# Altium PCB Baseboard-Development.PcbDoc (part 5 of 8)
Units mm, origin at the board's own origin, x right, y up, seen from the top; angles counter-clockwise.
Board outline 120 x 90 mm, 6 copper layers (Top Layer, SIGNAL-1, PWR, SIGNAL-2, GND-2, Bottom Layer), stack 1.705 mm thick; 417 components, 313 nets, 1500 pads, 606 vias.
Unrouted connection lines stored in the file: 357.
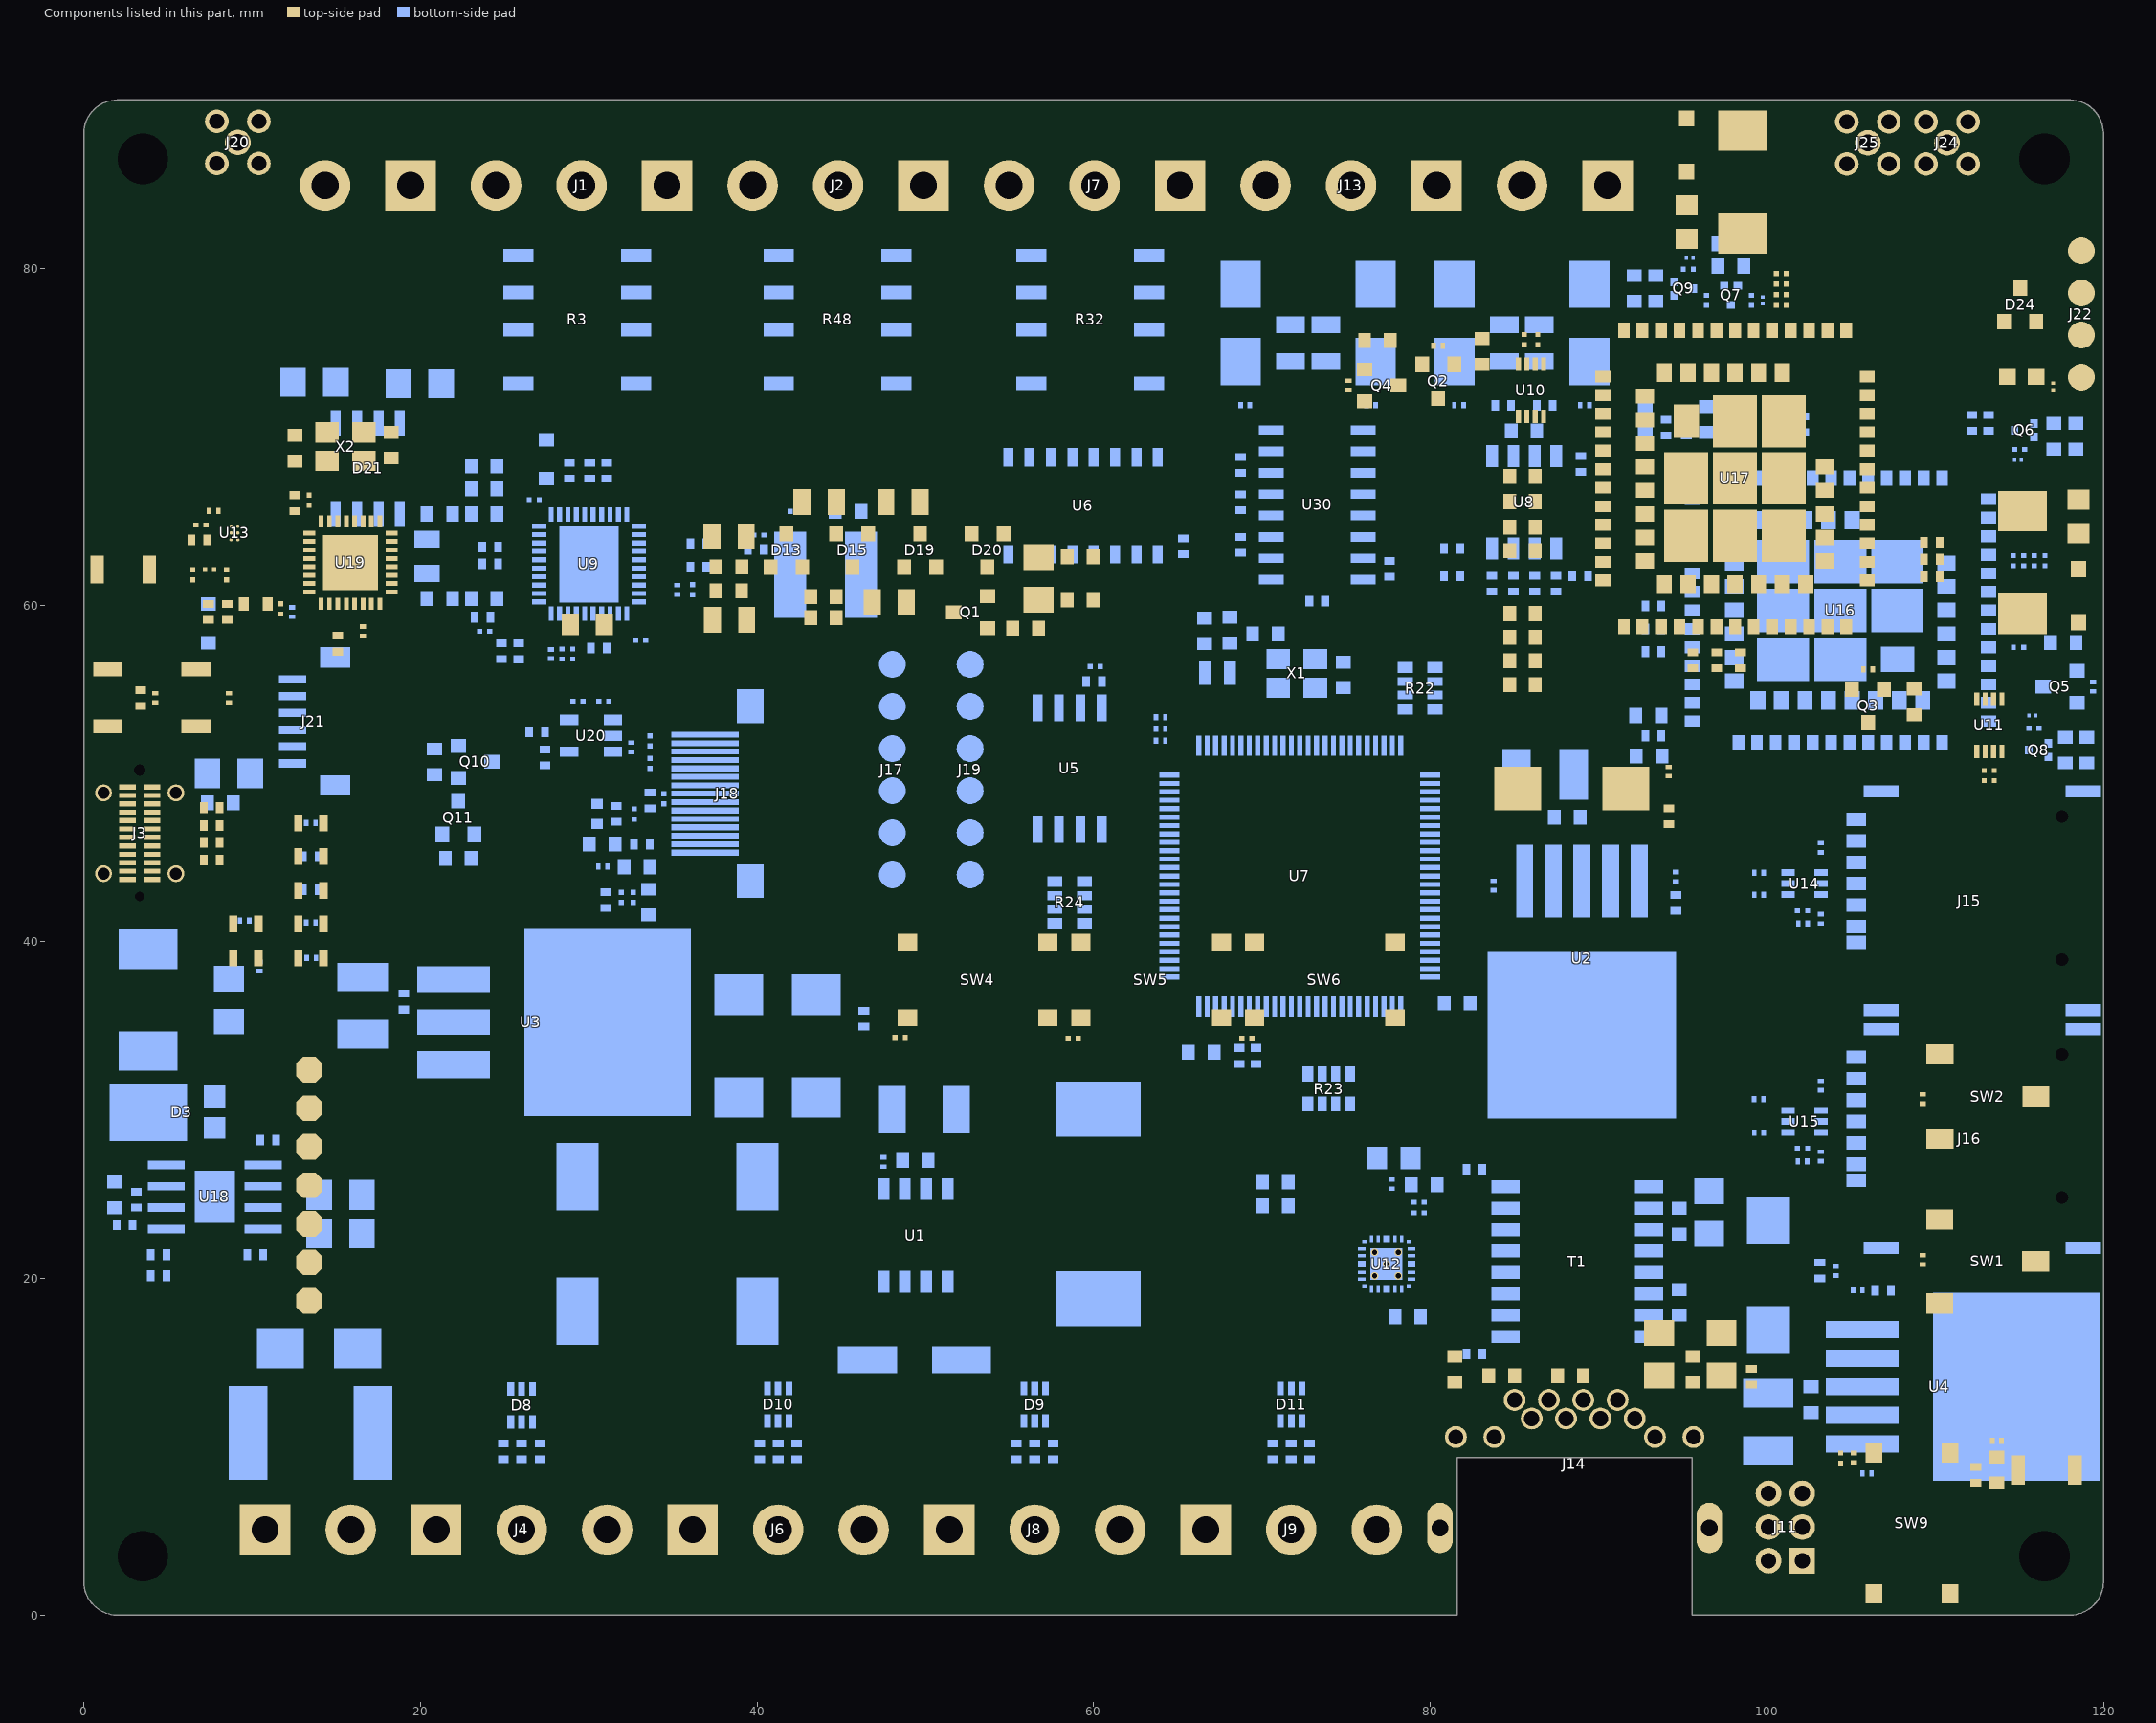
[diagram p6: the components of this part, seen from the top]

## Part data (continued)
SW3 SW7 SW8: "SWITCH TACTILE SPST-NO 0.05A 12V", Contact Current Rating=50mA, Contact Resistance=100mR, Insulation Resistance=100MR, LCSC Part Number=C231329, Manufacturer=Omron, Max Operating Temperature=70°C, Max Voltage Rating (DC)=12V, Min Operating Temperature=-25°C, Operating Force=1.5N, Package Quantity=1, Ratings="Dust Proof,IP40", Supplier Part Number 1=SW1020DKR-ND, Actuator Length=0.4mm, Actuator Type=Standard, ComponentLink1Description=http://www.farnell.com/datasheets/60838.pdf?src-supplier=Farnell, ComponentLink1URL=http://www.farnell.com/datasheets/60838.pdf?src-supplier=Farnell, ComponentLink2Description=http://www.farnell.com/datasheets/60838.pdf?src-supplier=Element14, ComponentLink2URL=http://www.farnell.com/datasheets/60838.pdf?src-supplier=Element14, ComponentLink3Description=https://omronfs.omron.com/en_US/ecb/products/pdf/en-b3u.pdf?src-supplier=Digi-Key, ComponentLink3URL=https://omronfs.omron.com/en_US/ecb/products/pdf/en-b3u.pdf?src-supplier=Digi-Key, ComponentLink4Description=http://www.omron.com/ecb/products/pdf/en-b3u.pdf?src-supplier=Digi-Key, ComponentLink4URL=http://www.omron.com/ecb/products/pdf/en-b3u.pdf?src-supplier=Digi-Key, ComponentLink5Description=https://www.distrelec.biz/Web/Downloads/he/et/B3U_eng_datasheet.pdf?mime=application%2Fpdf&src-supplier=Distrelec, ComponentLink5URL=https://www.distrelec.biz/Web/Downloads/he/et/B3U_eng_datasheet.pdf?mime=application%2Fpdf&src-supplier=Distrelec, ComponentLink6Description=http://www.onlinecomponents.com/productFiles/mf-OM/en-b3u.pdf?src-supplier=Onlinecomponents.com, ComponentLink6URL=http://www.onlinecomponents.com/productFiles/mf-OM/en-b3u.pdf?src-supplier=Onlinecomponents.com, ComponentLink7Description=https://www.verical.com/server-webapp/html/getDatasheet?partID=552554&src-supplier=Verical, ComponentLink7URL=https://www.verical.com/server-webapp/html/getDatasheet?partID=552554&src-supplier=Verical, ComponentLink8Description=http://www.farnell.com/datasheets/1685550.pdf?src-supplier=Element14, ComponentLink8URL=http://www.farnell.com/datasheets/1685550.pdf?src-supplier=Element14, ComponentLink9Description=http://www.farnell.com/datasheets/2610940.pdf?src-supplier=Farnell, ComponentLink9URL=http://www.farnell.com/datasheets/2610940.pdf?src-supplier=Farnell, ComponentLink10Description=https://www.alliedelec.com/m/d/4c8a9ef82804fc3c241a13c1e298fd73.pdf?src-supplier=Allied+Electronics, ComponentLink10URL=https://www.alliedelec.com/m/d/4c8a9ef82804fc3c241a13c1e298fd73.pdf?src-supplier=Allied+Electronics, Contact Material=Silver, Current Rating=50mA, Depth=2.5mm, Electrical Life=200000Cycles, Height=1.2mm, Illumination Type=Non-Illuminated,Illuminated, Item Type=Switch, Lead Free="Lead Free", Length=4mm, Manufacturer Part Number=B3U-1000P, Max Current Rating=50mA, Mechanical Life=200000Cycles, Mount="Surface Mount", Orientation=Straight, Packaging="Tape and Reel", Pricing 1="1=1, 10=0.961, 25=0.9064, 50=0.7976, 100=0.7251, 250=0.68888, 500=0.67074, 1000=0.52571 (USD)", REACH SVHC=Unknown, Stock 1=116454, Supplier 1=Digi-Key, Switch Function=Off-Mom, Switch Travel=0.15mm, Termination=SMD/SMT, Throw Configuration=SPST, Voltage Rating (DC)=12V, Weight=0.000776oz, Width=3mm
SW4 SW5 SW6 SW9: "-25℃~+85℃ 6mm 5mm Round Button 50mA Brick nogging 6mm SPST 100MΩ 100000 250gf@±30gf 12V SMD Tactile Switches ROHS", LCSC Part Number=C127509, Manufacturer="Korean Hroparts Elec", Package=SMD, ComponentLink1Description=LCSC, ComponentLink1URL=https://www.lcsc.com/product-detail/span-style-background-color-ff0-Tactile-span-Switches_Korean-Hroparts-Elec-K2-1102SP-C4SC-04_C127509.html, Item Type=Switch, Manufacturer Part Number=K2-1102SP-C4SC-04
T1: "XFRMR MAGNETIC 1PORT 1:1 10/100", Case/Package=Module, DC Resistance (DCR)=650mR, Isolation Voltage=1.5kV, LCSC Part Number=C18584, Manufacturer=Pulse, Max Operating Temperature=70°C, Min Operating Temperature=0°C, Package Quantity=40, Category=Transformers, ComponentLink1Description=https://datasheet.ciiva.com/2938/10-100base-tsingleportsmdmagnetics-rev2008-2938779.pdf?src-supplier=Digikey, ComponentLink1URL=https://datasheet.ciiva.com/2938/10-100base-tsingleportsmdmagnetics-rev2008-2938779.pdf?src-supplier=Digikey, Depth=9.53mm, Height=6.09mm, Height - Seated (Max)=6.22mm, Insertion Loss=-1.1dB, Item Type="RJ45 Transformer", Lead Free="Lead Free", Lead/Base Style="Gull Wing", Length=12.7mm, Manufacturer Part Number=H1102NL, Mounting Technology="Surface Mount", Packaging=Rail/Tube, Pins=16, Pricing="1=3.05066, 10=2.98754, 30=2.92442, 50=2.8613, 100=2.79819, 250=2.73507, 500=2.68247 (USD)", Radiation Hardening=No, Return Loss=-11.5dB, RoHS=Yes, RoHS Compliant=Yes, Series=-, Shielding=Unshielded, Stock=500, Supplier=Avnet, Supplier Part Number=H1102NL, Termination=SMD/SMT, Turns Ratio=1:1, Weight=0.098767oz, Width=7.11mm
U1: "Step-down type Fixed 12V 4.5V~40V 1.5A SOP-8 DC-DC Converters ROHS", LCSC Part Number=C3029050, Manufacturer="UMW(Youtai Semiconductor Co., Ltd.)", Package=SOP-8, ComponentLink1Description=LCSC, ComponentLink1URL=https://www.lcsc.com/product-detail/DC-DC-Converters_UMW-Youtai-Semiconductor-Co-Ltd-LM2594M-12_C3029050.html, Item Type=IC, Manufacturer Part Number=LM2594M-12
U2 U4: "IC REG LDO ADJ 3A TO263-5", Case/Package=TO-263, Dropout Voltage=370mV, Input Bias Current=40nA, LCSC Part Number=C11149, Manufacturer=Microchip, Max Input Voltage=26V, Max Operating Temperature=125°C, Max Output Current=3A, Max Output Voltage=25V, Min Input Voltage=2.5V, Min Operating Temperature=-40°C, Min Output Voltage=1.25V, Package Quantity=750, Quiescent Current=35mA, Reference Voltage=1.24V, Supplier Part Number 1=3153683, Accuracy=1%, Category="Voltage Regulators - Linear", ComponentLink1Description=https://datasheet.ciiva.com/23772/1572633-23772885.pdf?src-supplier=Newark, ComponentLink1URL=https://datasheet.ciiva.com/23772/1572633-23772885.pdf?src-supplier=Newark, ComponentLink2Description=https://datasheet.ciiva.com/16296/mic29150-16296190.pdf?src-supplier=Future+Electronics, ComponentLink2URL=https://datasheet.ciiva.com/16296/mic29150-16296190.pdf?src-supplier=Future+Electronics, ComponentLink3Description=https://datasheet.ciiva.com/15200/getdatasheetpartid-143209-15200663.pdf?src-supplier=Verical, ComponentLink3URL=https://datasheet.ciiva.com/15200/getdatasheetpartid-143209-15200663.pdf?src-supplier=Verical, Height=4.59mm, Item Type=IC, Lead Free="Lead Free", Length=10.67mm, Manufacturer Part Number=MIC29302WU-TR, Mount="Surface Mount", Number of Outputs=1, Number of Pins=5, Number of Regulators=1, Output Configuration=Positive, Output Current=3A, Output Type=Adjustable, Output Voltage=26V, Packaging="Tape and Reel", Polarity=Positive, Pricing 1="750=2.12000, 1500=2.09000, 2250=2.07000, 3000=2.06000, 3750=2.02000 (USD)", Radiation Hardening=No, Reach SVHC Compliant=Yes, RoHS=Yes, RoHS Compliant=Yes, Series=-, Supplier 1="Future Electronics", Width=9.17mm
U3: "72dB@(120Hz) 5A Fixed 3.3V~3.3V Positive 12V TO-263-3 Linear Voltage Regulators (LDO) ROHS", LCSC Part Number=C259972, Manufacturer=HGSEMI, Package=TO-263-3, ComponentLink1Description=LCSC, ComponentLink1URL=https://www.lcsc.com/product-detail/Linear-Voltage-Regulators-LDO_HGSEMI-LM1084S-3-3-TR_C259972.html, Item Type=IC, Manufacturer Part Number=LM1084S-3.3/TR
U5: "IC FLASH 128MBIT SPI/QUAD 8SOIC", Case/Package=SOIC, Frequency=133MHz, LCSC Part Number=C97521, Manufacturer=Winbond, Max Operating Temperature=85°C, Min Operating Temperature=-40°C, Category=Flash, ComponentLink1Description=http://www.winbond.com/resource-files/w25q128jv%20revf%2003272018%20plus.pdf?src-supplier=Digikey, ComponentLink1URL=http://www.winbond.com/resource-files/w25q128jv%20revf%2003272018%20plus.pdf?src-supplier=Digikey, Item Type=IC, Manufacturer Part Number=W25Q128JVSIQ, Memory Format=Non-Volatile,FLASH, Memory Size=128Mb, Mounting Technology="Surface Mount", Packaging=Tray, Pricing="1=1.6411, 10=1.4568, 25=1.4422, 50=1.3009, 100=1.2498, 250=1.2373, 500=1.1781, 1000=1.1392, 5000=1.0957 (USD)", RoHS=Yes, RoHS Compliant=Yes, Series=SpiFlash®, Stock=3659, Supplier="Arrow Electronics", Supplier Part Number=W25Q128JVSIQ
U6: "100uA@50V 3V@2V,300mA 1.6V@350mA 4mA@12V 100uA@50V 1.25V@350mA 500mA 25pF SOP-16_150mil Darlington Transistor Arrays ROHS", LCSC Part Number=C181730, Manufacturer=Mixic, Package=SOP-16_150mil, ComponentLink1Description=LCSC, ComponentLink1URL=https://www.lcsc.com/product-detail/Darlington-Transistor-Arrays_Mixic-ULN2003A_C181730.html, Item Type=IC, Manufacturer Part Number=ULN2003A
U7: "IC MCU 32BIT 512KB FLASH 100LQFP", Case/Package=LQFP, Frequency=168MHz, LCSC Part Number=C28730, Manufacturer=STMicroelectronics, Max Operating Temperature=85°C, Max Supply Voltage=3.6V, Min Operating Temperature=-40°C, Min Supply Voltage=1.8V, Package Quantity=90, Supplier Part Number 1=73T7121, Category=Microcontrollers, ComponentLink1Description=https://datasheet.ciiva.com/16330/dm00037051-16330920.pdf?src-supplier=Future+Electronics, ComponentLink1URL=https://datasheet.ciiva.com/16330/dm00037051-16330920.pdf?src-supplier=Future+Electronics, ComponentLink2Description=https://datasheet.ciiva.com/8055/1717982-8055038.pdf?src-supplier=Element14, ComponentLink2URL=https://datasheet.ciiva.com/8055/1717982-8055038.pdf?src-supplier=Element14, ComponentLink3Description=https://datasheet.ciiva.com/4837/dm00037051-492832-4837637.pdf?src-supplier=Mouser, ComponentLink3URL=https://datasheet.ciiva.com/4837/dm00037051-492832-4837637.pdf?src-supplier=Mouser, Core Architecture=ARM, Data Bus Width=32b, Height=1.45mm, Interface=I2C,SPI,CAN,I2S,UART,USB,Ethernet,IrDA,USART,LIN,EBI/EMI, Item Type=IC, Lead Free="Lead Free", Length=14.2mm, Manufacturer Part Number=STM32F407VET6, Max Frequency=168MHz, Memory Size=512KB, Memory Type=FLASH, Number of ADC Channels=16, Number of Ethernet Channels=1, Number of I2C Channels=3, Number of I/Os=82, Number of Pins=100, Number of Programmable I/O=82, Number of PWM Channels=2, Number of SPI Channels=3, Number of Timers/Counters=14, Number of UART Channels=2, Oscillator Type=Internal, Packaging=Tray, Peripherals="Brown-out Detect/Reset,POR,PWM,WDT,DMA,LCD,I2C", Pricing 1="1=16.05000, 10=14.76000, 25=14.15000, 50=13.31000, 100=12.47000 (USD)", Radiation Hardening=No, RAM Size=196KB, REACH SVHC="No SVHC", RoHS=Yes, RoHS Compliant=Yes, Series="STM32 F4", Supplier 1=Newark, Watchdog Timer=Yes, Width=14.2mm
U8: "SOP-8 RS-485/RS-422 ICs ROHS", LCSC Part Number=C519086, Manufacturer=HGSEMI, Package=SOP-8, ComponentLink1Description=LCSC, ComponentLink1URL=https://www.lcsc.com/product-detail/RS-485-RS-422-ICs_HGSEMI-SP3485EIM-TR_C519086.html, Item Type=IC, Manufacturer Part Number=SP3485EIM/TR
U9: "IC TELECOM INTERFACE 40QFN", Manufacturer="Skyworks Solutions", Supplier Part Number=336-5396-ND, Category=Uncategorized, Item Type=IC, Manufacturer Part Number=SI32185-A-GM, Pricing="1=7.24, 10=6.536, 25=6.2324, 80=5.41138, 364=5.16816, 728=4.71216, 1092=4.10414 (USD)", RoHS=No, Stock=2912, Supplier=Digikey
U10 U11: "IC TRNSLTR BIDIRECTIONAL US8", Case/Package=VSSOP, High Level Output Current=-20uA, Low Level Output Current=20uA, Manufacturer="Texas Instruments", Max Operating Temperature=85°C, Max Supply Voltage=5.5V, Min Operating Temperature=-40°C, Min Supply Voltage=1.65V, Output Current=50mA, Package Quantity=1, Category="Integrated Circuits (ICs)", ComponentLink1Description=https://datasheet.ciiva.com/4226/sces641b-4226901.pdf?src-supplier=Arrow+Electronics, ComponentLink1URL=https://datasheet.ciiva.com/4226/sces641b-4226901.pdf?src-supplier=Arrow+Electronics, ComponentLink2Description=https://datasheet.ciiva.com/15096/getdatasheetpartid-226009-15096242.pdf?src-supplier=Verical, ComponentLink2URL=https://datasheet.ciiva.com/15096/getdatasheetpartid-226009-15096242.pdf?src-supplier=Verical, ComponentLink3Description=https://datasheet.ciiva.com/14287/txb0102-14287498.pdf?src-supplier=Avnet, ComponentLink3URL=https://datasheet.ciiva.com/14287/txb0102-14287498.pdf?src-supplier=Avnet, ComponentLink4Description=https://datasheet.ciiva.com/14287/txb0102-14287370.pdf?src-supplier=Avnet, ComponentLink4URL=https://datasheet.ciiva.com/14287/txb0102-14287370.pdf?src-supplier=Avnet, ComponentLink5Description=https://datasheet.ciiva.com/6619/txb0102-6619255.pdf?src-supplier=Digi-Key, ComponentLink5URL=https://datasheet.ciiva.com/6619/txb0102-6619255.pdf?src-supplier=Digi-Key, ComponentLink6Description=https://datasheet.ciiva.com/6619/txb0102-6619256.pdf?src-supplier=Digi-Key, ComponentLink6URL=https://datasheet.ciiva.com/6619/txb0102-6619256.pdf?src-supplier=Digi-Key, ComponentLink7Description=https://datasheet.ciiva.com/6619/txb0102-6619257.pdf?src-supplier=Digi-Key, ComponentLink7URL=https://datasheet.ciiva.com/6619/txb0102-6619257.pdf?src-supplier=Digi-Key, Contact Plating=Gold, Data Rate=100Mbps, Height=0.85mm, Lead Free="Lead Free", Length=2.3mm, Logic Function=Translator, Manufacturer Part Number=TXB0102DCUT, Mount="Surface Mount", Number of Bits=2, Number of Channels=2, Number of Inputs=2, Number of Pins=8, Output Type=3-STATE, Packaging="Tape and Reel", Pricing 1="1=0.79330, 10=0.66470, 25=0.65820, 250=0.37450, 500=0.36200, 1000=0.29770, 2500=0.28440 (USD)", Propagation Delay=31ns, Radiation Hardening=No, REACH SVHC="No SVHC", RoHS=Yes, RoHS Compliant=Yes, Series=-, Stock 1=10, Supplier 1="Arrow Electronics", Supplier Part Number 1=TXB0102DCUT, Turn-On Delay Time=7.4ns, Weight=0.000339oz, Width=2mm
U12: "IC TXRX FULL/HALF 1/1 24WQFN", Manufacturer="Texas Instruments", Supplier Part Number=595-DP83825IRMQR, Category="Ethernet Interface ICs", ComponentLink1Description=http://www.ti.com/general/docs/suppproductinfo.tsp?distId=10&amp;gotoUrl=http%3A%2F%2Fwww.ti.com%2Flit%2Fgpn%2Fdp83825I&src-supplier=Digikey, ComponentLink1URL=http://www.ti.com/general/docs/suppproductinfo.tsp?distId=10&amp;gotoUrl=http%3A%2F%2Fwww.ti.com%2Flit%2Fgpn%2Fdp83825I&src-supplier=Digikey, Item Type=IC, Manufacturer Part Number=DP83825IRMQR, Pricing="1=1.33, 10=1.14, 50=1.14, 100=0.868, 1000=0.606, 10000=0.528 (USD)", RoHS=Yes, Stock=48053, Supplier=Mouser
U13: "IC RF SWITCH SPDT 2.7GHZ 6WLCSP", LCSC Part Number=C429943, Manufacturer="Skyworks Solutions", Supplier Part Number=863-1809-1-ND, Test Frequency=2.7GHz, Category="RF Semiconductors and Devices", ComponentLink1Description=http://www.skyworksinc.com/uploads/documents/SKY13489_001_202857C.pdf?src-supplier=Digikey, ComponentLink1URL=http://www.skyworksinc.com/uploads/documents/SKY13489_001_202857C.pdf?src-supplier=Digikey, ComponentLink2Description=https://www.skyworksinc.com/-/media/SkyWorks/Documents/Products/2201-2300/SKY13489_001_202857D.pdf?src-supplier=Digikey, ComponentLink2URL=https://www.skyworksinc.com/-/media/SkyWorks/Documents/Products/2201-2300/SKY13489_001_202857D.pdf?src-supplier=Digikey, Insertion Loss=0.2dB, Item Type=IC, Manufacturer Part Number=SKY13489-001, P1dB=39dBm, Packaging="Cut Tape", Pricing="1=1.17, 10=1.049, 25=0.9956, 100=0.8177, 250=0.76436, 500=0.67548, 1000=0.53328, 2500=0.49773 (USD)", RoHS=Yes, RoHS Compliant=Yes, Series=-, Stock=3063, Supplier=Digikey, Throw Configuration=SPDT
U14 U15: "15V 5 Unidirectional 5V SOT-363 ESD Protection Devices ROHS", LCSC Part Number=C5180312, Manufacturer=ElecSuper, Package=SOT-363, ComponentLink1Description=LCSC, ComponentLink1URL=https://www.lcsc.com/product-detail/ESD-Protection-Devices_ElecSuper-SMF05CT1G-ES_C5180312.html, Item Type="ESD Diode", Manufacturer Part Number=SMF05CT1G-ES
U16 U17: "LGA-85_19.6x19.6x1.10P RF Modules ROHS", LCSC Part Number=C5362858, Manufacturer="SIMCom Wireless Solutions", Package=LGA-85_19.6x19.6x1.10P, ComponentLink1Description=LCSC, ComponentLink1URL=https://www.lcsc.com/product-detail/RF-Modules_SIMCom-Wireless-Solutions-A7682E_C5362858.html, Item Type=Module, Manufacturer Part Number=A7682E
U18: "IC REG BCK SPLIT RL ADJ 8SOPWR", LCSC Part Number=C1850368, Manufacturer="Texas Instruments", Package=SO-8, ComponentLink1Description=LCSC, ComponentLink1URL=https://www.lcsc.com/product-detail/DC-DC-Converters_Texas-Instruments-TPS54540BDDAR_C1850368.html, Item Type=IC, Manufacturer Part Number=TPS54540BDDAR
U19: "RF TXRX MODULE BLUETOOTH SMD", LCSC Part Number=C2858491, Manufacturer="Espressif Systems", Supplier Part Number=1904-ESP32-C3FH4CT-ND, Category=Uncategorized, Item Type=IC, Manufacturer Part Number=ESP32-C3FH4, Pricing="1=1.3 (USD)", RoHS=No, Stock=7160, Supplier=Digikey
U20: "5V Input 350mA LDO", LCSC Part Number=C620011, Manufacturer="Union Semiconductor", Package=SOT-23-5, ComponentLink1Description=LCSC, ComponentLink1URL=https://www.lcsc.com/product-detail/Linear-Voltage-Regulators-LDO_Union-Semiconductor-UM1750S-00_C620011.html, Item Type=IC, Manufacturer Part Number=UM1750S-00
U30: "250Kbps transceiver 2/2 SOP-16 RS232 ICs ROHS", LCSC Part Number=C2904738, Manufacturer=UMW, Package=SOP-16, ComponentLink1Description=LCSC, ComponentLink1URL=https://www.lcsc.com/product-detail/RS232-ICs_UMW-Youtai-Semiconductor-Co-Ltd-MAX3232ESE_C2904738.html, Item Type=IC, Manufacturer Part Number=MAX3232ESE
X1: library part X322524MOB4SI, "24MHz SMD Crystal Resonator 12pF ±10ppm ±30ppm -40℃~+85℃ SMD3225-4P Crystals ROHS", LCSC Part Number=C70590, Manufacturer="Yangxing Tech", ComponentLink1Description=LCSC, ComponentLink1URL=https://www.lcsc.com/product-detail/Crystals_Yangxing-Tech-X322524MOB4SI_C70590.html, Item Type=Crystal, Manufacturer Part Number=X322524MOB4SI
X2: library part X322540MPB4SI, "40MHz SMD Crystal Resonator 15pF SMD3225-4P Crystals ROHS", LCSC Part Number=C9010, Manufacturer="Yangxing Tech", ComponentLink1Description=LCSC, ComponentLink1URL=https://www.lcsc.com/product-detail/Crystals_Yangxing-Tech-X322540MPB4SI_C9010.html, Item Type=Crystal, Manufacturer Part Number=X322540MPB4SI
X3: library part FC-12M32.768KHZ7PF20PPM, "CRYSTAL 32.7680KHZ 9PF SMD", LCSC Part Number=C99009, Manufacturer="Seiko Epson", Package=SMD2012-2P, ComponentLink1Description=LCSC, ComponentLink1URL=https://www.lcsc.com/product-detail/Crystals_Seiko-Epson-FC-12M32-768KHZ7PF20PPM_C99009.html, Item Type=Crystal, Manufacturer Part Number=FC-12M32.768KHZ7PF20PPM

## Free pads (board coordinates)
  round 0 hole 3 unplated: MH0(3.5,3.5) MH0(3.5,86.5) MH0(116.5,86.5) MH0(116.5,3.5)

## Via types
v1: diameter 0.6, hole 0.3, Top Layer to Bottom Layer, tented both sides, 606 vias